# Altium PCB Mat_Tren.PcbDoc
Units mm, origin at the board's own origin, x right, y up, seen from the top; angles counter-clockwise.
Board outline 52.2 x 25.53 mm, 2 copper layers (Top Layer, Bottom Layer); 13 components, 12 nets, 50 pads, 11 vias.
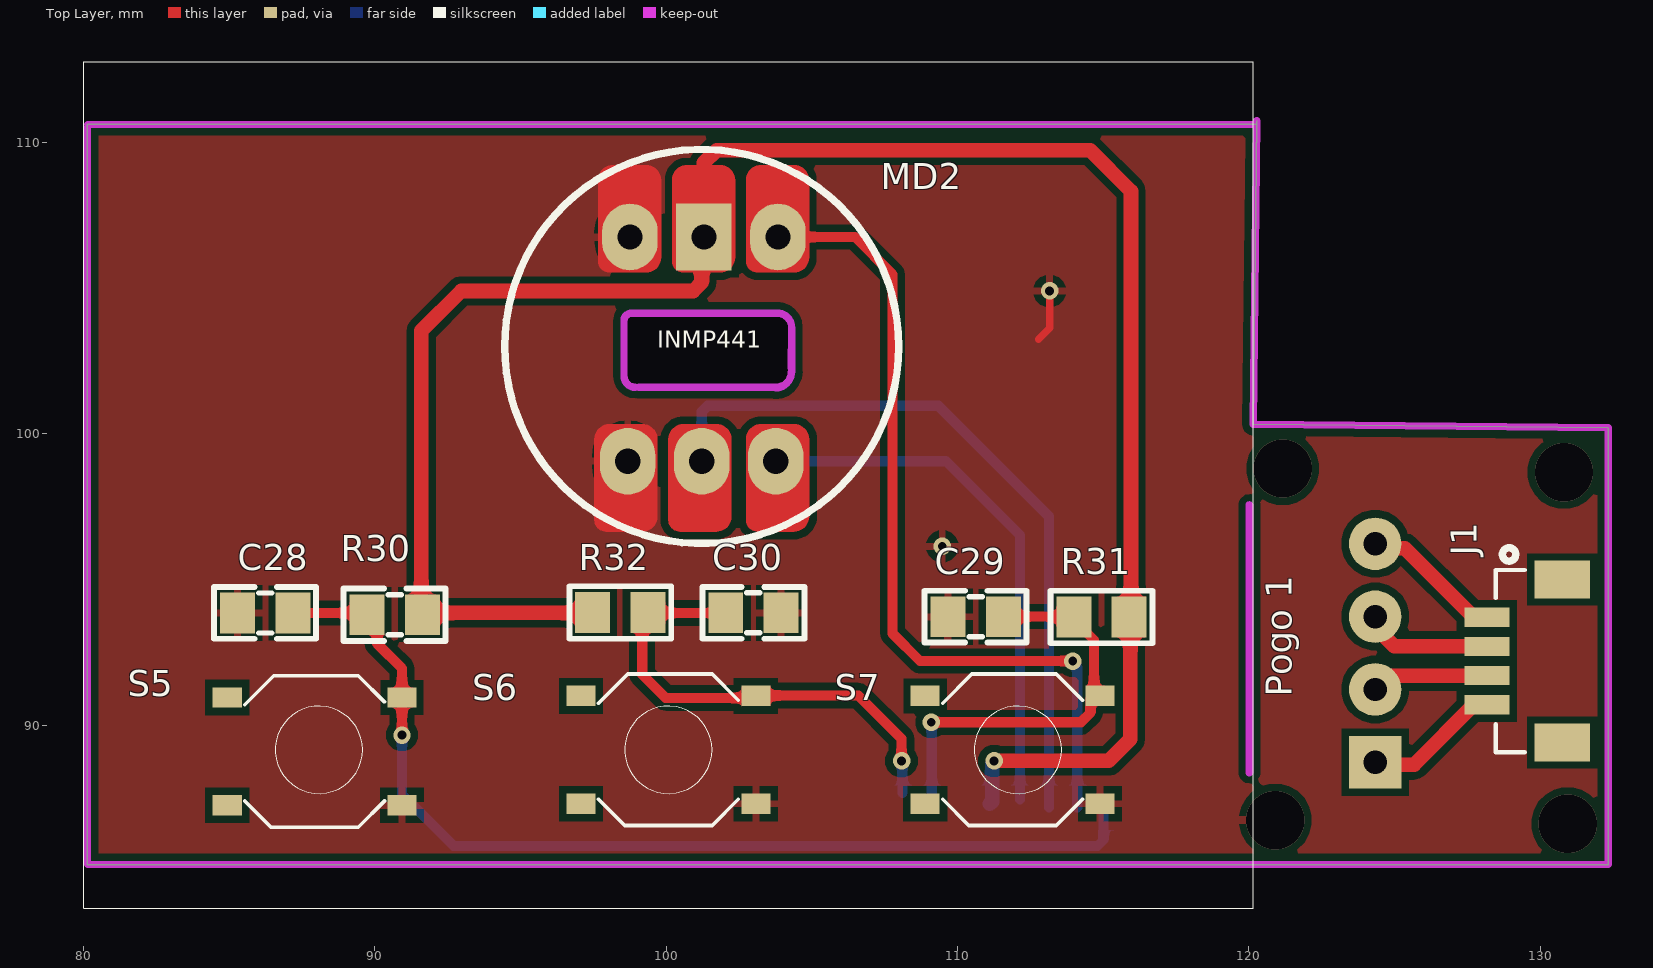
[diagram p0: Top Layer view]
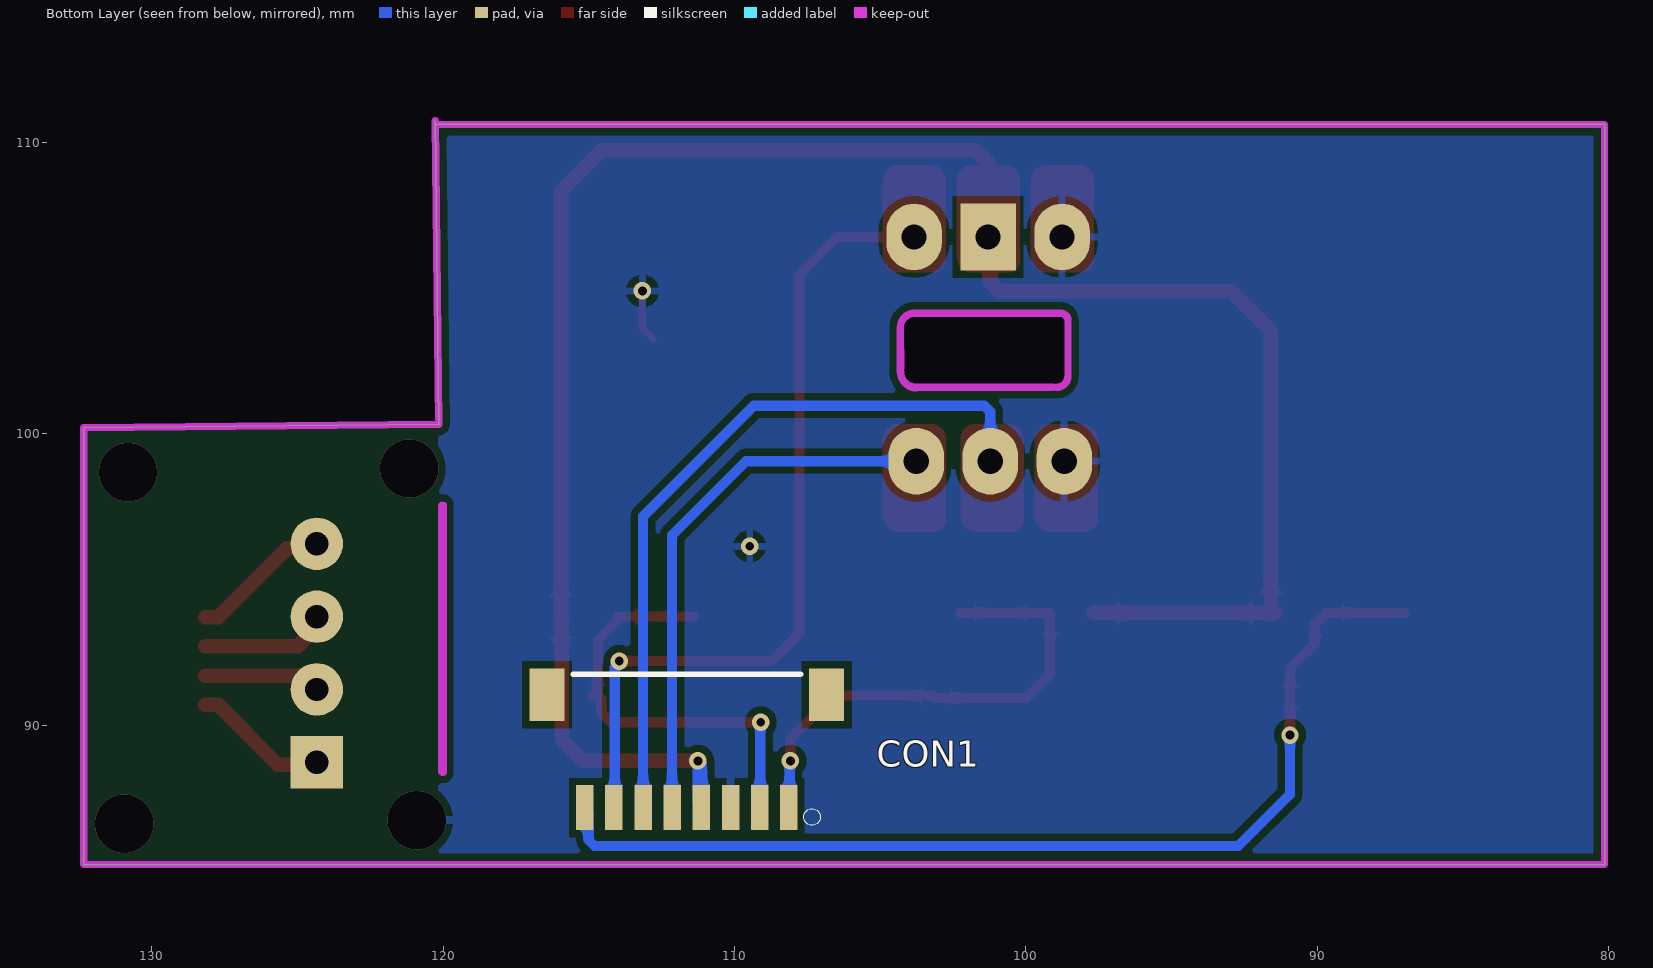
[diagram p1: Bottom Layer view, seen from below]
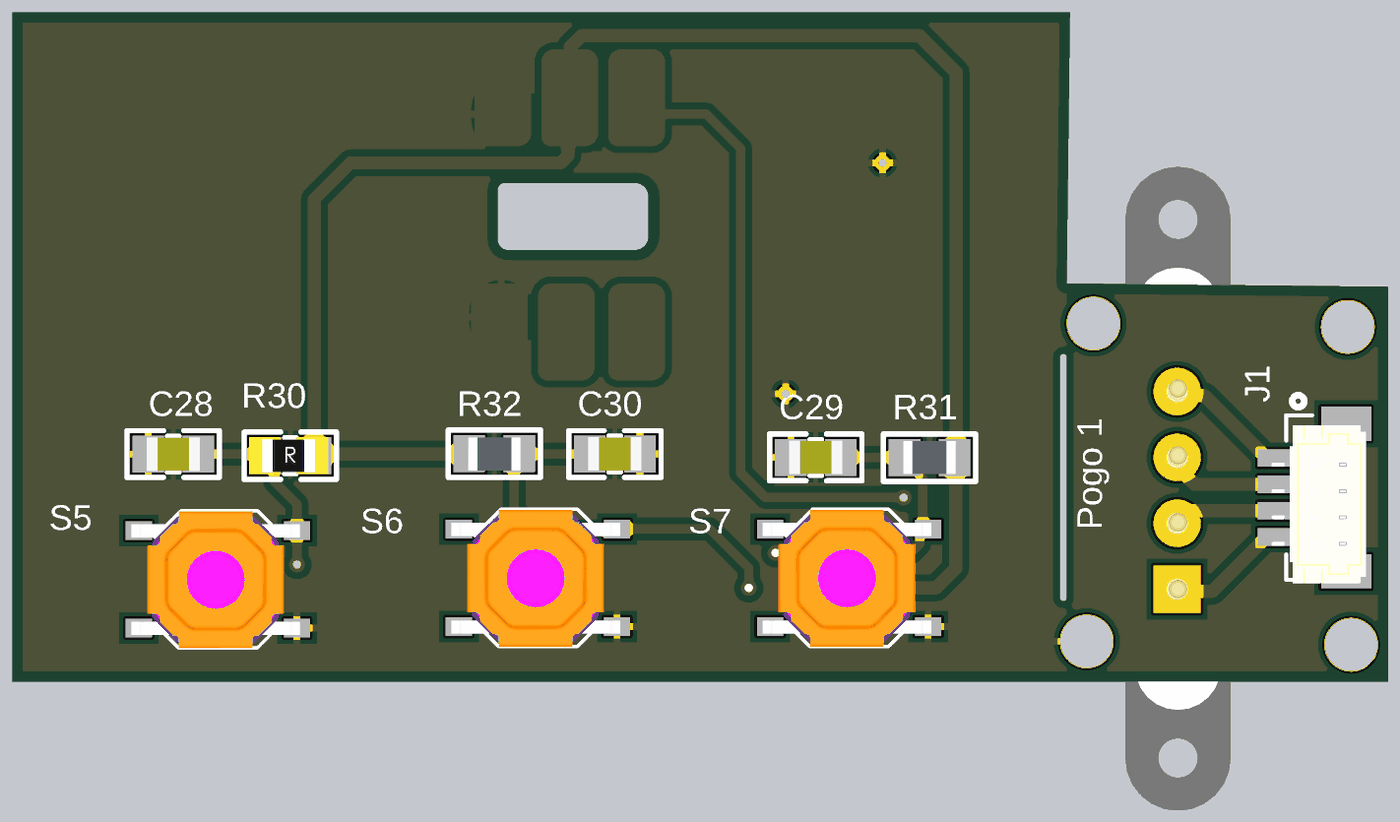
[diagram p2: 3D render of the assembled board from above, using the file's embedded part models]

## Layer stack, top to bottom
Top Solder: solder mask 0.0102, Solder Resist, Dk 3.5
Top Layer: signal copper 0.0356
Dielectric 1: dielectric 0.32, FR-4, Dk 4.8
Bottom Layer: signal copper 0.0356
Bottom Solder: solder mask 0.0102, Solder Resist, Dk 3.5

## Board outline
80.137,85.217 132.334,85.217 132.334,100.203 120.142,100.33 120.269,110.744 120.269,110.617 80.137,110.617
cut-out: 119.888,88.392 ccw(c120.015,88.392) 120.142,88.392 120.142,97.536 ccw(c120.015,97.536) 119.888,97.536
cut-out: 98.552,101.981 98.552,103.886 cw(c98.806,103.886) 98.806,104.14 103.759,104.14 cw(c103.759,103.632) 104.267,103.632 104.267,102.108 cw(c103.759,102.108) 103.759,101.6 98.933,101.6 cw(c98.933,101.981)
cut-out: 98.552,101.981 98.552,103.886 cw(c98.806,103.886) 98.806,104.14 103.759,104.14 cw(c103.759,103.632) 104.267,103.632 104.267,102.108 cw(c103.759,102.108) 103.759,101.6 98.933,101.6 cw(c98.933,101.981)

## Design rules (kind name [scope] priority, off if disabled: settings)
Clearance [All] p1: gap=0.254 ignorepadtopadclearanceinfootprint=FALSE
PolygonConnect [All] p1: connectstyle=Relief reliefconductorwidth=0.254 reliefentries=4 polygonreliefangle="90 Angle" airgapwidth=0.254
RoomDefinition Mat_Tren [InComponentClass('Mat_Tren')] p1: confinementstyle=ConfineIn formatcopy=TRUE lockcomponents=FALSE outline 0,0 50.8,0 50.8,25.4 0,25.4
RoutingVias [All] p1: holewidth=0.3 width=0.6 viastyle="Through Hole" minholewidth=0.3 minwidth=0.6 maxholewidth=0.3 maxwidth=0.6
SolderMaskExpansion [All] p1: expansion=0.102 istentingtop=FALSE
Width [All] p1: maxlimit=0.5 minlimit=0.254 preferedwidth=0.35
30 further rules are at their usual default settings.

## Components (designator, comment, footprint, x,y, rotation, side; value= is the part's Value field where it differs from the comment)
C28 "104" "tu 0805" 86.233,93.853 r0 top
C29 "104" "tu 0805" 110.617,93.726 r0 top
C30 "104" "tu 0805" 102.997,93.853 r180 top
CON1 "Header 8pin 1.0mm" JST_SM08B-SRSS-TB 111.633,91.948 r0 bottom
J1 "Header 4pin 1.0mm" "CONN4_BM04B-SRSS_JST - duplicate" 130.048,92.202 r270 top (schematic designator J?)
MD2 "Module INMP441" "Module INMP441" 223.774,-203.454 r0 top locked
"Pogo 1" "Pogo 4 pin" "Pogo 4 pin" 127.381,88.472 r90 top (schematic designator "Pogo ?")
R30 "10K" "tro smd 0805" 90.678,93.853 r0 top
R31 "10K" "RES 0805" 114.935,93.726 r0 top
R32 "10K" "RES 0805" 98.425,93.853 r180 top
S5 "Button" SW4-SMD-5.2X5.2X1.5MM 87.932,89.099 r0 top
S6 "Button" SW4-SMD-5.2X5.2X1.5MM 111.887,89.154 r0 top
S7 "Button" SW4-SMD-5.2X5.2X1.5MM 100.076,89.154 r0 top

## Footprints (in the part's own frame and the unit in brackets; to place one, negate y for a bottom-side part, rotate by r counter-clockwise, add the part's x,y. Pads: shape width x height; smd on the part's side, far side on the other; paste and mask are expansions set on the pad)
"CONN4_BM04B-SRSS_JST - duplicate" [mil]
  rect 26x61 smd: 1(-59.06,-74.1) 2(-19.68,-74.1) 3(19.68,-74.1) 4(59.06,-74.1)
  rect 51x75 smd: 5(-110.24,27.47) 6(110.24,27.47)
  silkscreen extent -153,-62 123,-23, body extent -108,-85 128,57, height 171
JST_SM08B-SRSS-TB [mm]
  rect 0.6x1.55 smd: 1(-3.5,4.775) 2(-2.5,4.775) 3(-1.5,4.775) 4(-0.5,4.775) 5(0.5,4.775) 6(1.5,4.775) 7(2.5,4.775) 8(3.5,4.775)
  rect 1.2x1.8 smd: P1(-4.8,0.9) P2(4.8,0.9)
  silkscreen extent -4.58,0.2 3.9,5.38, body extent -5,0.13 5,5.08, height 2.95
"Module INMP441" [mil]
  oval 75x90 hole 34: 1(-4922,12213) 3(-4722,12213) 4(-4725,11910) 5(-4825,11910) 6(-4925,11910)
  rect 75x90 hole 34: 2(-4822,12213)
  silkscreen extent -5091,11799 -4559,12331, body extent -5100,11789 -4540,12331, height 259
"Pogo 4 pin" [mm]
  rect 1.8x1.8 hole 0.8: 1(0.254,3.048)
  round 1.8 hole 0.8: 2(2.754,3.048) 3(5.254,3.048) 4(7.754,3.048)
  body extent -8.16,1.02 16.28,5.02, height 1
"RES 0805" [mm]
  rect 1.2x1.4 smd: 1(-0.946,-0.01) 2(0.954,-0.01)
  silkscreen extent -1.75,-0.91 1.75,0.89, body extent -1,-0.62 1,0.63, height 0.5
SW4-SMD-5.2X5.2X1.5MM [mm]
  rect 1x0.7 smd: 1(-3,1.85) 2(-3,-1.85) 3(3,1.85) 4(3,-1.85)
  silkscreen extent -2.4,-2.6 2.4,2.6, body extent -3.28,-2.62 3.12,2.58, height 1.5
"tro smd 0805" [mm]
  rect 1.2x1.4 smd: 1(-0.946,-0.061) 2(0.954,-0.061)
  silkscreen extent -1.75,-0.97 1.75,0.84, body extent -1.56,-0.76 1.44,0.64, height 0.53
"tu 0805" [mm] "Compoment SMD 80x50mil"
  rect 1.2x1.4 smd: 1(-0.946,-0.003) 2(0.954,-0.003)
  silkscreen extent -1.75,-0.89 1.75,0.89, body extent -1.01,-0.64 1.01,0.63, height 0.61

## Part data
C28 C29 C30: library part "Tu 0805 104 50V 10%", "Dán", Chung_Loai=Dán, Don_Vi=Con, Ma_Hang=MH004551, So_Chan=2, Ten_Linh_Kien="Tụ 0805 104-100nF 10% 50V"
CON1: "SH Series 8 Position 1 mm Pitch Surface Mount Side Entry Shrouded Header", Package=None, Availability=Unavailable, MF="{'manufacturer': u'JST Sales America Inc.'}", MP=SM08B-SRSS-TB, Price=None
J1: "Connector Header Surface Mount, Right Angle 4 position 0.039 (1.00mm)", Package=None, Check_prices=https://www.snapeda.com/parts/SM04B-SRSS-TB/JST/view-part/?ref=eda, MF="JST Sales", MP=SM04B-SRSS-TB, SnapEDA_Link=https://www.snapeda.com/parts/SM04B-SRSS-TB/JST/view-part/?ref=snap
R30: library part "Tro 0805 1% 10k", "Dán", Chung_Loai=Dán, Don_Vi=Con, Ma_Hang=MH005473, So_Chan=2, Ten_Linh_Kien="Trở 0805 1% 10k"
R31 R32: library part "RES 0805", "RES SMD 0805", Manufacturer="Vishay Dale", Manufacturer Part Number=CRCW040210K0FKED, Operating Temperature="-55°C ~ 155°C", Package / Case="0402 (1005 Metric)", Power (Watts)="0.063W, 1/16W", Resistance (Ohms)=10k, Supplier Part Number 1=541-10.0KLCT-ND, Temperature Coefficient=±100ppm/°C, Tolerance=±1%, Category=Resistors, ComponentLink1Description=http://www.vishay.com/docs/20035/dcrcwe3.pdf, ComponentLink1URL=http://www.vishay.com/docs/20035/dcrcwe3.pdf, Composition="Thick Film", Features="Automotive AEC-Q200", Height="0.016\" (0.40mm)", Number of Terminations=2, Packaging="Cut Tape (CT)", Pricing 1="10=0.083, 50=0.0444, 200=0.0255, 1000=0.0174 (USD)", RoHS="RoHS Compliant", Size / Dimension="0.039\" L x 0.020\" W (1.00mm x 0.50mm)", Stock 1=2392462, Supplier 1=Digi-Key, Supplier Device Package="0402 (1005 Metric)"
S5 S6 S7: "Tactile Switch SPST-NO Side Actuated Through Hole, Right Angle", Package=None, Check_prices=https://www.snapeda.com/parts/431256058716/W%25C3%25BCrth+Elektronik+Midcom/view-part/?ref=eda, MF="WÃ¼rth Elektronik", MP=431256058716, SnapEDA_Link=https://www.snapeda.com/parts/431256058716/W%25C3%25BCrth+Elektronik+Midcom/view-part/?ref=snap

## Via types
v1: diameter 0.6, hole 0.3, Top Layer to Bottom Layer, tented both sides, 5 vias
v2: diameter 2, hole 2, Top Layer to Bottom Layer, 4 vias
v3: diameter 0.6, hole 0.3, Top Layer to Bottom Layer, 2 vias

## Nets (pads, with @x,y where several pads share a name; then routed paths per layer and width w, separated by ;. In a path a pad name is that pad's centre, name@x,y a point inside that pad or via, vN(x,y) a via of type N, cw(c..) or ccw(c..) an arc to the next point about the centre after c; other vN are vias at no path point)
GND: C28.1 C29.1 C30.1 CON1.3 MD2.1 MD2.6 S5.4 S6.4 S7.4 | length 1.8
  Top Layer w0.254: 112.776,103.251 113.157,103.632 v3(113.157,104.902)
  other v2: 120.904,86.741
  other v3: 109.474,96.139
IO4: CON1.6 MD2.5 | length 25.3
  Bottom Layer w0.35: MD2.5 101.219,100.76 101.424,100.965 109.336,100.965 113.133,97.168 CON1.6
IO5: CON1.5 MD2.4 | length 18.5
  Bottom Layer w0.35: MD2.4 109.601,99.06 112.141,96.52 CON1.5@112.141,87.444
IO6: CON1.7 MD2.3 | length 28.5
  Top Layer w0.35: MD2.3 106.477,106.756 107.761,105.472 107.761,93.153 108.712,92.202 v1(113.952,92.202)
  Bottom Layer w0.35: v1(113.952,92.202) 113.952,92.134 114.109,91.977 CON1.7@114.109,87.173
IO39: CON1.8 R30.1 S5.3 | length 35.4
  Top Layer w0.35: 86.983,93.853 R30.1@89.694,93.853 ; R30.1 90.081,93.443 90.081,92.799 90.932,91.948 v1(90.932,89.662)
  Bottom Layer w0.35: v1(90.932,89.662) 90.932,87.63 92.71,85.852 114.803,85.852 115.008,86.057 115.008,87.048 CON1.8
IO40: C29.2 CON1.2 R31.1 S6.3 | length 15
  Top Layer w0.35: v1(109.093,90.1) 114.23,90.1 114.564,90.434 114.564,90.887 S6.3@114.681,91.004 ; C29.2@111.367,93.726 R31.1@113.989,93.726 ; R31.1 113.989,93.616 114.681,92.924 S6.3@114.681,91.004 ; S6.3 S6.3@114.681,91.004
  Bottom Layer w0.35: v1(109.093,90.1) 109.113,90.08 109.113,87.193 CON1.2
IO41: CON1.1 R32.1 S7.3 | length 16.9
  Top Layer w0.35: 102.247,93.853 99.175,93.853 99.175,91.738 99.981,90.932 103.116,90.932 103.201,91.018 106.594,91.018 108.077,89.535 v1(108.077,88.773)
  Bottom Layer w0.35: v1(108.077,88.773) 108.105,88.745 108.105,87.685 CON1.1@108.109,87.681
NetJ?_1: "Pogo 1.4" J1.1 | length 5.5
  Top Layer w0.5: 123.698,96.146 123.769,96.075 125.348,96.075 127.721,93.702 J1.1
NetJ?_2: "Pogo 1.3" J1.2 | length 4.9
  Top Layer w0.5: 123.698,93.646 124.05,93.646 124.994,92.702 J1.2
NetJ?_3: "Pogo 1.2" J1.3 | length 4.7
  Top Layer w0.5: 123.698,91.146 124.05,91.146 124.606,91.702 J1.3
NetJ?_4: "Pogo 1.1" J1.4 | length 5.3
  Top Layer w0.5: 123.698,88.646 125.665,88.646 127.721,90.702 J1.4
VCC: CON1.4 MD2.2 R30.2 R31.2 R32.2 | length 71.2
  Top Layer w0.5: R30.2@91.428,93.853 R32.2@97.675,93.853 ; R30.2@91.594,93.853 91.594,103.532 92.964,104.902 100.926,104.902 101.219,105.195 101.219,106.68 MD2.2 101.295,109.296 101.727,109.728 114.554,109.728 115.951,108.331 115.951,93.778 R31.2 115.932,93.674 115.932,89.516 115.189,88.773 v1(111.252,88.773) ; R30.2 R30.2@91.632,93.853
  Bottom Layer w0.5: CON1.4@111.109,87.3 111.183,87.374 111.183,88.677 111.252,88.746 v1(111.252,88.773)
pads on no net: C28.2 C30.2 CON1.P1 CON1.P2 J1.5 J1.6 S5.1 S5.2 S6.1 S6.2 S7.1 S7.2
copper on no net:
  other v2: 130.937,86.614 130.81,98.679 121.158,98.806

## Polygon pours and split planes (outlines as drawn)
no net on Top Layer "NONET_L01_P002" (solid, pour order 2): 119.761,100.33 132.207,100.33 132.334,100.203 132.334,85.217 119.888,85.217 119.634,85.471 119.761,85.598
GND on Top Layer "GND_L01_P000" (solid, pour order 0): 80.264,110.617 120.142,110.617 120.142,85.471 119.888,85.217 80.01,85.217 80.01,110.363
GND on Bottom Layer "GND_L02_P001" (solid, pour order 1): 80.289,110.621 120.167,110.621 120.167,85.475 119.913,85.221 80.035,85.221 80.035,110.367

## Keep-outs
Keep-Out Layer:
  lines w0.254: 80.137,110.522 80.137,85.217 116.586,85.217 132.334,85.217 132.334,100.203 120.142,100.33 120.269,110.744 ; 80.137,110.617 120.269,110.617 ; 98.933,101.6 cw(c98.933,101.981) 98.552,101.981 98.552,103.886 cw(c98.806,103.886) 98.806,104.14 103.81,104.14 cw(c103.81,103.644) 104.306,103.644 104.306,102.147 cw(c103.759,102.147) 103.759,101.6 ; 99.06,101.6 103.886,101.6 ; 103.759,101.579 ccw(c103.759,102.108) 104.288,102.108 ; 104.288,102.256 104.306,103.615 ; 120.015,88.392 120.015,97.536

## Other copper
Top Layer:
  region net IO5: 102.743,99.822 cw(c103.251,99.822) 103.251,100.33 104.394,100.33 cw(c104.394,99.822) 104.902,99.822 104.902,97.155 cw(c104.394,97.155) 104.394,96.647 103.124,96.647 cw(c103.124,97.028) 102.743,97.028
  region net IO4: 100.076,99.822 cw(c100.584,99.822) 100.584,100.33 101.727,100.33 cw(c101.727,99.822) 102.235,99.822 102.235,97.155 cw(c101.727,97.155) 101.727,96.647 100.457,96.647 cw(c100.457,97.028) 100.076,97.028
  region net GND: 97.536,99.822 cw(c98.044,99.822) 98.044,100.33 99.187,100.33 cw(c99.187,99.822) 99.695,99.822 99.695,97.155 cw(c99.187,97.155) 99.187,96.647 97.917,96.647 cw(c97.917,97.028) 97.536,97.028
  region net IO6: 102.743,108.712 cw(c103.251,108.712) 103.251,109.22 104.394,109.22 cw(c104.394,108.712) 104.902,108.712 104.902,106.045 cw(c104.394,106.045) 104.394,105.537 103.124,105.537 cw(c103.124,105.918) 102.743,105.918
  region net VCC: 100.203,108.712 cw(c100.711,108.712) 100.711,109.22 101.854,109.22 cw(c101.854,108.712) 102.362,108.712 102.362,106.045 cw(c101.854,106.045) 101.854,105.537 100.584,105.537 cw(c100.584,105.918) 100.203,105.918
  region net GND: 97.663,108.712 cw(c98.171,108.712) 98.171,109.22 99.314,109.22 cw(c99.314,108.712) 99.822,108.712 99.822,106.045 cw(c99.314,106.045) 99.314,105.537 98.044,105.537 cw(c98.044,105.918) 97.663,105.918

## Silkscreen, mask and mechanical layers (free items; w line width, h text height)
Top Overlay:
  circle w0.013: c100.076,89.154 r1.5
  circle w0.013: c112.071,89.154 r1.5
  circle w0.013: c88.081,89.154 r1.5
  lines w0.013: 80.006,83.715 80.006,112.772 120.146,112.772 120.146,83.715 80.006,83.715
Mechanical 1:
  circle w0.013: c88.335,88.493 r1.5
  circle w0.013: c112.325,88.493 r1.5
  circle w0.013: c100.33,88.493 r1.5
  lines w0.013: 100.33,88.493 100.33,92.917

## Text inside footprints (layer, text, board x,y; h text height)
MD2: Top Overlay "INMP441" at 99.695,102.743 h1